# Altium PCB PCB4270Y_A00.PcbDoc (part 1 of 4)
Units mil, origin at the board's own origin, x right, y up, seen from the top; angles counter-clockwise.
Board outline 3622.05 x 2007.87 mil, 4 copper layers (Top Layer, Signal Layer 2, Signal Layer 3, Bottom Layer), stack 62.992 mil thick; 126 components, 105 nets, 457 pads, 1130 vias.
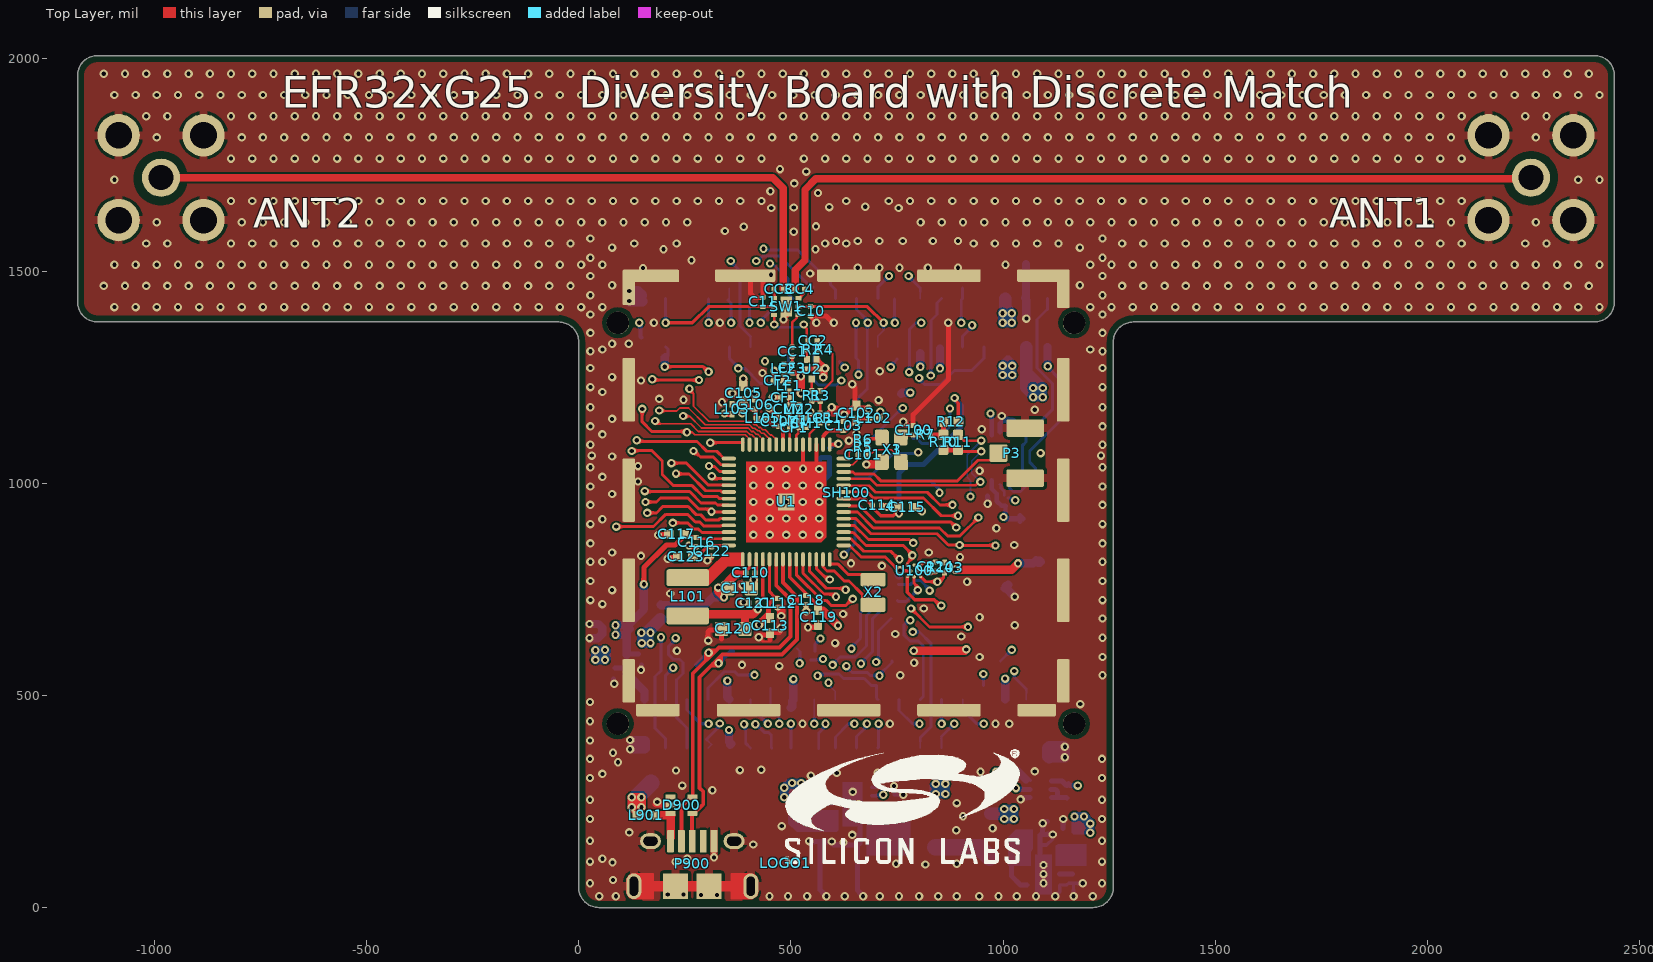
[diagram p0: Top Layer view]
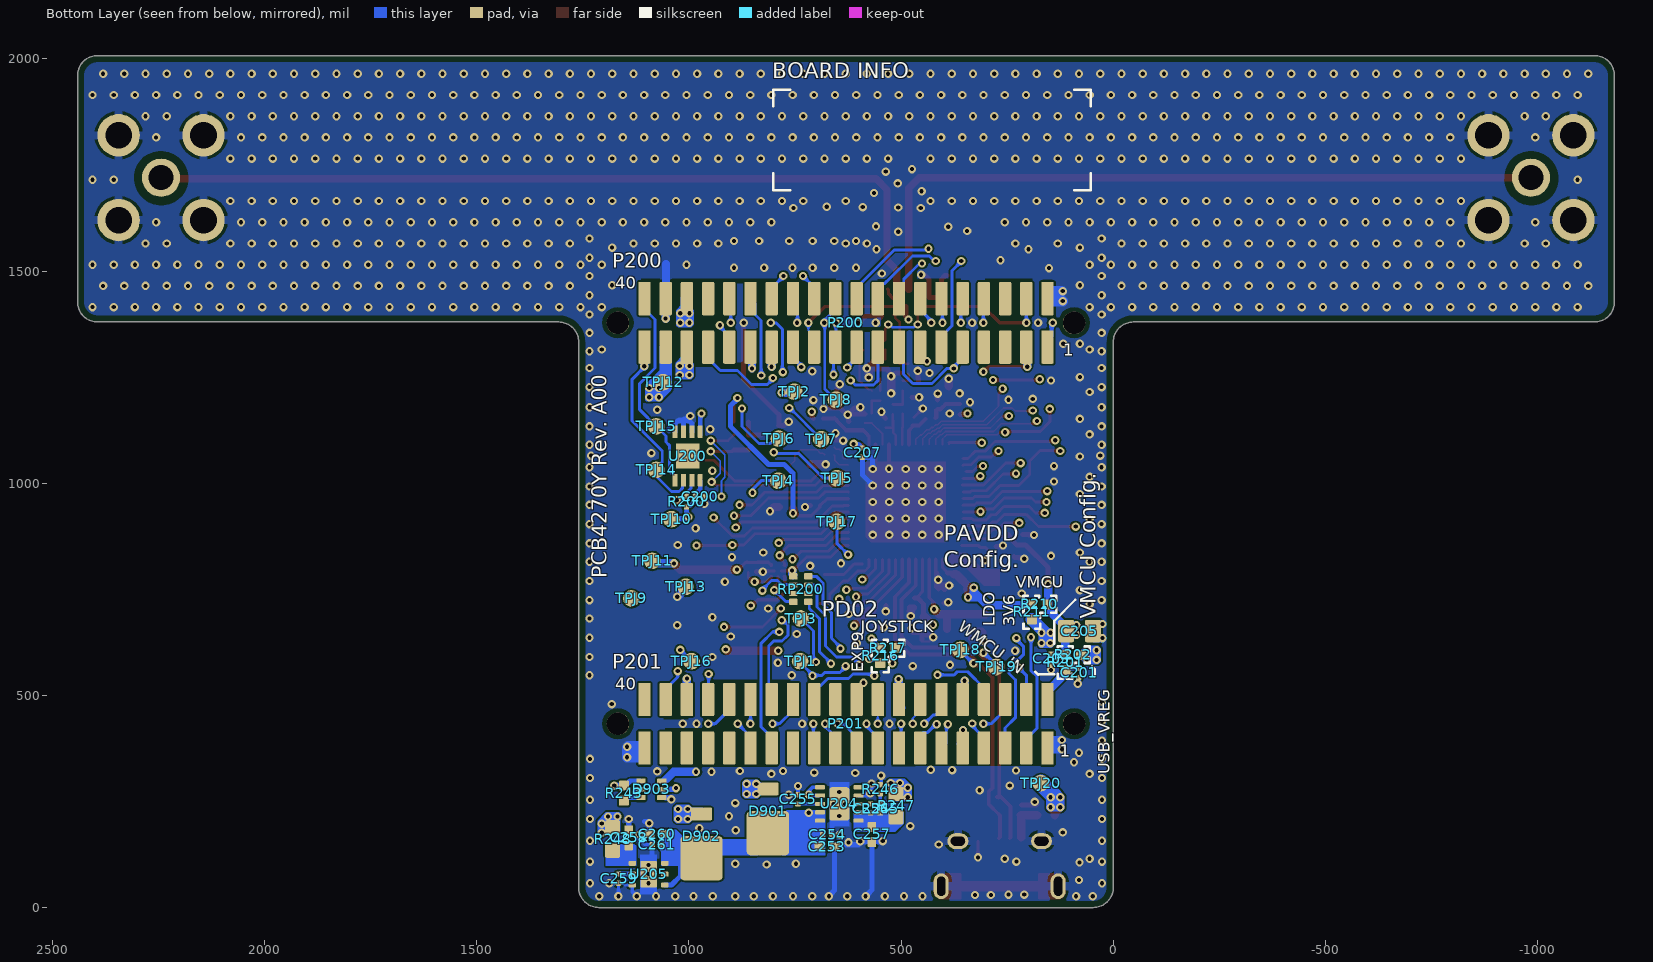
[diagram p1: Bottom Layer view, seen from below]
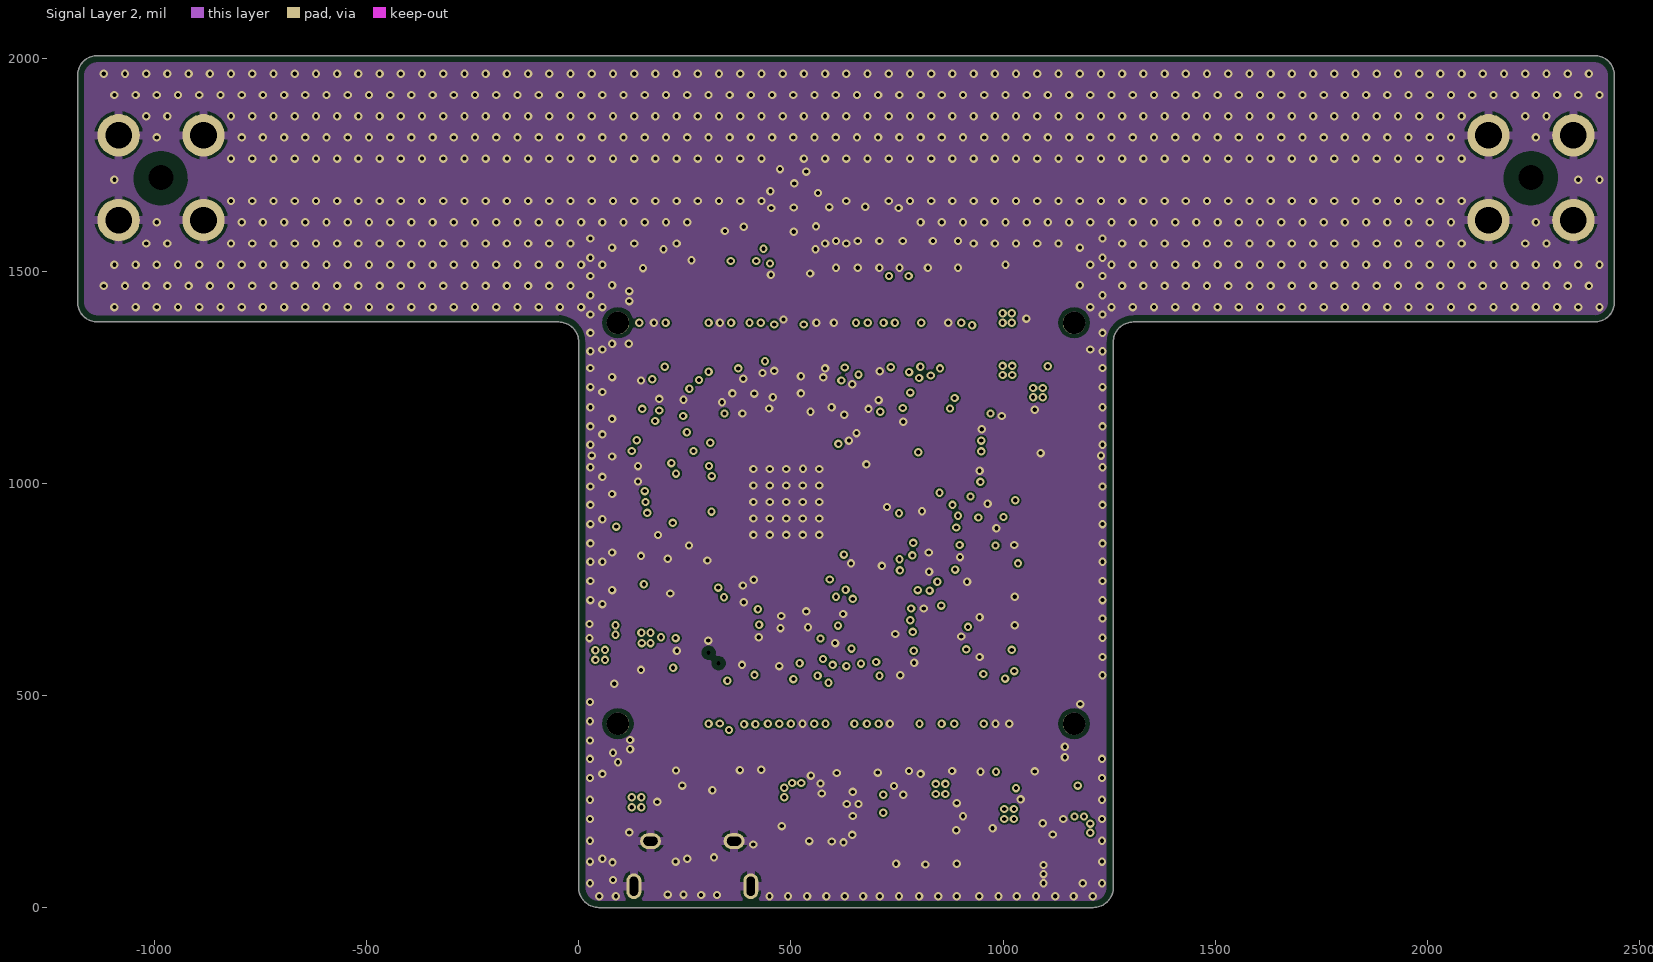
[diagram p2: Signal Layer 2]
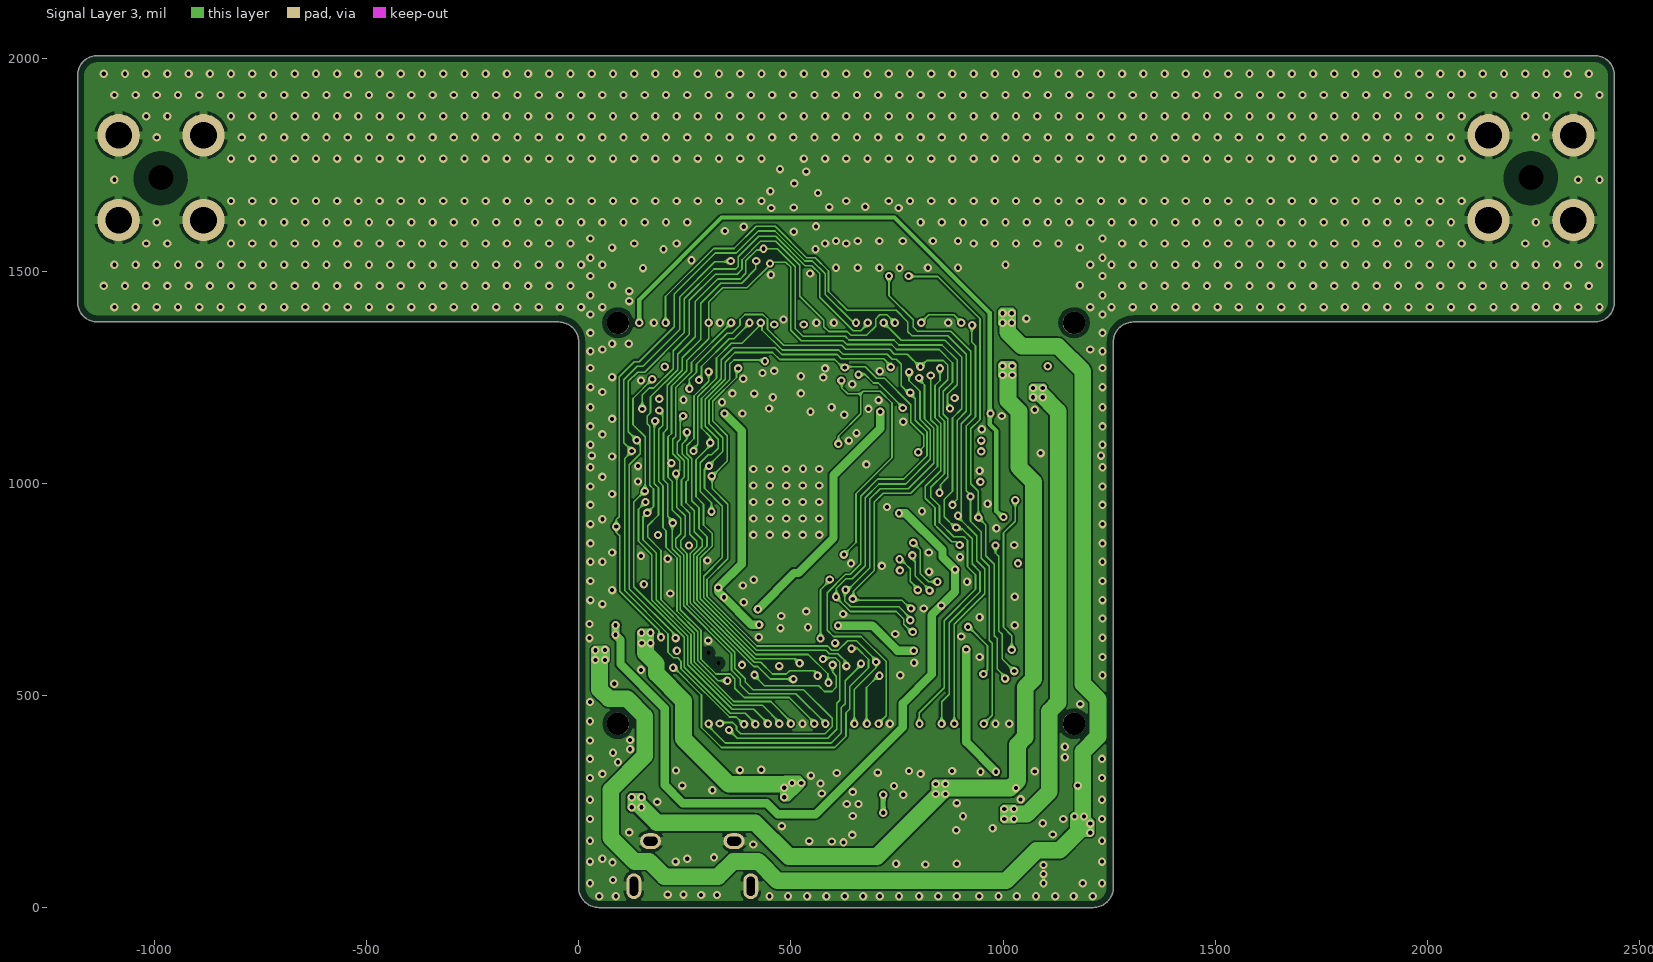
[diagram p3: Signal Layer 3]

## Layer stack, top to bottom
Top Solder: solder mask 0.4, Solder Resist, Dk 3.5
Top Layer: signal copper 1.378
Dielectric 1: core 12.7953, FR-4, Dk 4.2
Signal Layer 2: signal copper 0.7087
Dielectric 3: prepreg 33.2283, Dk 4.2
Signal Layer 3: signal copper 0.7087
Dielectric 2: core 12.7953, Dk 4.2
Bottom Layer: signal copper 1.378
Bottom Solder: solder mask 0.4, Solder Resist, Dk 3.5

## Board outline
0,1332.76 ccw(c-47.24,1332.76) -47.24,1380 -1133.86,1380 cw(c-1133.86,1427.24) -1181.1,1427.24 -1181.1,1960.63 cw(c-1133.86,1960.63) -1133.86,2007.87 2393.7,2007.87 cw(c2393.7,1960.63) 2440.94,1960.63 2440.94,1427.24 cw(c2393.7,1427.24) 2393.7,1380 1307.08,1380 ccw(c1307.08,1332.76) 1259.84,1332.76 1259.84,47.24 cw(c1212.6,47.24) 1212.6,0 47.24,0 cw(c47.24,47.24) 0,47.24

## Design rules (kind name [scope] priority, off if disabled: settings)
AcuteAngle [All] p1: minimum=7.00000000000000E+0001 checktracksonly=FALSE
BoardOutlineClearance [All] p1: gap=15.75 ignorepadtopadclearanceinfootprint=FALSE
Clearance Clearance_50Ohm [InNetClass('50Ohm') vs InNet('GND')] p1: gap=10 ignorepadtopadclearanceinfootprint=FALSE except(5.91: Track-SMDPad; 7.87: SMDPad-SMDPad)
Clearance Clearance_to_Holes [InPadClass('NPTH')] p2: gap=10 ignorepadtopadclearanceinfootprint=FALSE
Clearance Clearance_Outer_Layers_ThinGPIO [All vs OnLayer('Top Layer') and InNetClass('ThinGPIO')] p3: gap=3.94 ignorepadtopadclearanceinfootprint=FALSE
Clearance Clearance_Outer_Layers [All vs OnLayer('Top Layer') or OnLayer('Bottom Layer')] p4: gap=3.94 ignorepadtopadclearanceinfootprint=FALSE
Clearance Clearance_Inner_Layers [All vs OnLayer('Signal Layer 2') or OnLayer('Signal Layer 3')] p5: gap=3.94 ignorepadtopadclearanceinfootprint=FALSE except(6.89: Via-Via)
HoleToHoleClearance HoleToHoleClearance_ANT1toPAD [Incomponent ('ANT1') vs ISpad] p1: gap=0 allowstackedmicrovias=TRUE
HoleToHoleClearance HoleToHoleClearance_R1toR2_1 [Incomponent ('R1') vs Incomponent ('R2')] p2: gap=0 allowstackedmicrovias=TRUE
HoleToHoleClearance HoleToHoleClearance_U1toVIA_1 [InComponent ('U1') vs IsVia] p3: gap=0 allowstackedmicrovias=TRUE
HoleToHoleClearance [All] p4: gap=10 allowstackedmicrovias=TRUE
MinimumSolderMaskSliver [All] p1: minsoldermaskwidth=2.95
PolygonConnect Polygon_VIA_Connect [IsVia] p1: connectstyle=Direct reliefconductorwidth=10 reliefentries=4 polygonreliefangle="90 Angle" airgapwidth=10
PolygonConnect PolygonConnect_SH100 [InComponent('SH100')] p2: connectstyle=Direct reliefconductorwidth=10 reliefentries=4 polygonreliefangle="90 Angle" airgapwidth=5
PolygonConnect PolygonConnect_P1 [InComponent('P1') or InComponent('P900') or InComponent('P2') or InComponent('P3') or InComponent('ANT1') or InComponent('ANT2')] p3: connectstyle=Relief reliefconductorwidth=20 reliefentries=4 polygonreliefangle="90 Angle" airgapwidth=6.89
PolygonConnect [All] p4: connectstyle=NoConnect reliefconductorwidth=7.87 reliefentries=4 polygonreliefangle="90 Angle" airgapwidth=4.92
RoutingVias [All] p1: holewidth=11.81 width=25.59 viastyle="Through Hole" minholewidth=9.84 minwidth=19.68 maxholewidth=39.37 maxwidth=59.06
ShortCircuit ShortCircuit_ANTtoPAD [InNet('NetAT1_1') vs InNet('GND')] p1: allowed=TRUE
ShortCircuit ShortCircuit_R1toR2_1 [Incomponent ('R1') vs Incomponent ('R2')] p2: allowed=TRUE
ShortCircuit [All] p3: allowed=FALSE
SilkToSilkClearance [All] p1: silktosilkclearance=4
SilkToSolderMaskClearance [IsPad] p1: minsilkscreentomaskgap=4 clearancetoexposedcopper=TRUE
SolderMaskExpansion [All] p1: expansion=2 istentingtop=FALSE
Width 50ohm [InNet('50R*')] p1: maxlimit=18 minlimit=4.88 preferedwidth=18
Width [All] p2: maxlimit=200 minlimit=3.94 preferedwidth=4.92
25 further rules are at their usual default settings.

## Classes and differential pairs
net class EFR32_PD0[7..0]: DISP_SCS EFR32_PD00 EFR32_PD01 EFR32_PD02 EFR32_PD03 EFR32_PD04 EFR32_PD06 EFR32_PD07
net class EFR32_PC0[9..0]: DISP_SCLK DISP_SI EFR32_PC00 EFR32_PC01 EFR32_PC02 EFR32_PC03 EFR32_PC06 EFR32_PC07 EFR32_PC08 EFR32_PC09
net class EFR32_PB0[5..0]: DISP_ENABLE EFR32_PB00 EFR32_PB01 EFR32_PB02 EFR32_PB03 EFR32_PB04
component class "05_ WSTK Connectors & B": C200 P200 P201 R200 TPJ1 TPJ2 TPJ3 TPJ4 TPJ5 TPJ6 TPJ7 TPJ8 TPJ9 TPJ10 TPJ11 TPJ12 TPJ13 TPJ14 TPJ15 TPJ16 TPJ17 TPJ18 TPJ19 TPJ20 U200
component class "04_ EFR32 Signal Assign": C124 C207 P3 R10 R11 R12 R103 R216 R217 RP200 U1 U100 X2
component class "03_ Board Power": C201 C203 C205 C253 C254 C255 C256 C257 C258 C259 C260 C261 D900 D901 D902 D903 L901 P900 R201 R202 R243 R245 R246 R247 R248 U204 U205
component class "02_ RF & Power": ANT1 ANT2 C10 C11 C100 C101 C102 C103 C105 C106 C107 C110 C111 C112 C113 C114 C115 C116 C117 C118 C119 C120 C121 C122 C123 CC1 CC2 CC3 CC4 CF1 CF2 CF3 CM1 CM2 CP1 CR1 L101 L102 L103 L105 LF1 LF2 LM1 LM2 LR1 R1 R2 R3 R4 R5 R6 R7 R210 R211 SH100 SH101 SW1 U2 X1 X3
net class WSTK_P[45..0]: DBG_SWCLK DBG_SWDIOTMS "DBG_SWO / DBG_TDO" DBG_TDI DEBUG_TRACED1 DEBUG_TRACED2 DEBUG_TRACED3 DISP_ENABLE DISP_EXTCOMIN DISP_SCLK DISP_SCS DISP_SI EFR32_PA0 EFR32_PA8 EFR32_PA9 EFR32_PA10 EFR32_PA11 EFR32_PB00 EFR32_PB01 EFR32_PB02 EFR32_PB03 EFR32_PB04 EFR32_PC06 EFR32_PC07 EFR32_PC08 EFR32_PD03 EFR32_PD04 EXP_HEADER4 EXP_HEADER6 EXP_HEADER8 EXP_HEADER9 JOYSTICK WSTK_P19 WSTK_P22 WSTK_P28 WSTK_P30 WSTK_P32 WSTK_P34 WSTK_P38 WSTK_P39 WSTK_P40
net class WSTK_F[21..0]: DBG_RESET DBG_SWCLK DBG_SWDIOTMS "DBG_SWO / DBG_TDO" DBG_TDI DISP_ENABLE DISP_EXTCOMIN DISP_SCLK DISP_SCS DISP_SI EFR32_PA0 EFR32_PA8 EFR32_PA9 EFR32_PA10 EFR32_PA11 EFR32_PB00 EFR32_PB01 EFR32_PC06 EFR32_PC07 EFR32_PD03 EFR32_PD04 WSTK_F21
pad class NPTH: P200-M1 P200-M2 P201-M1 P201-M2
net class EFR32_PA[11..0]: DBG_SWCLK DBG_SWDIOTMS "DBG_SWO / DBG_TDO" DBG_TDI DEBUG_TRACED1 DEBUG_TRACED2 DEBUG_TRACED3 EFR32_PA0 EFR32_PA8 EFR32_PA9 EFR32_PA10 EFR32_PA11

## Components (designator, comment, footprint, x,y, rotation, side; value= is the part's Value field where it differs from the comment)
ANT1 "SMA" TE_SMA_1814832_TH_VER 2244.09,1720 r0 top (schematic designator P1)
ANT2 "SMA" TE_SMA_1814832_TH_VER -984.25,1720 r0 top (schematic designator P2)
C10 "10pF" C0201_L 546.26,1405.51 r270 top
C11 "10pF" C0201_L 434.06,1427.17 r90 top
C100 "100N" C0201_L 788.12,1124.8 r90 top
C101 "100P" C0201_L 669.29,1066.93 r180 top
C102 "1U" C0402_L 654.53,1165.35 r90 top
C103 "100P" C0201_L 623.03,1134.84 r90 top
C105 "470N" C0402_L 387.8,1211.61 r90 top
C106 "100P" C0201_L 414.37,1185.04 r90 top
C107 "100P" C0201_L 471.44,1144.69 r90 top
C110 "100N" C0201_L 404.53,788.39 r0 top
C111 "10U" C0603_L 378.94,751.97 r0 top
C112 "10N" C0201_L 468.5,717.52 r270 top
C113 "1U" C0402_L 450.79,664.37 r270 top
C114 "100N" C0201_L 702.76,947.83 r0 top
C115 "1U" C0402_L 772.64,943.9 r0 top
C116 "100N" C0201_L 276.57,861.22 r270 top
C117 "1U" C0402_L 230.31,879.92 r180 top
C118 "100N" C0201_L 535.43,724.41 r270 top
C119 "1U" C0402_L 563.98,684.06 r270 top
C120 "4U7" C0603_L 364.17,656.5 r180 top
C121 "100N" C0201_L 412.4,717.52 r180 top
C122 "100N" C0201_L 312.99,839.57 r270 top
C123 "1U" C0402_L 251.97,826.77 r180 top
C124 "100N" C0201_L 840.55,803.15 r270 top
C200 "100N" C0201_L 974.41,968.5 r180 bottom
C201 "100N" C0201_L 81.69,553.15 r270 bottom
C203 "100N" C0201_L 146.65,586.61 r270 bottom
C205 "10U" C0805_L 79.72,651.57 r180 bottom
C207 "100N" C0201_L 591.54,1071.85 r270 bottom
C253 "1U" C0402_L 675.2,143.7 r180 bottom
C254 "100N" C0201_L 674.21,171.26 r180 bottom
C255 "100N" C0201_L 743.11,254.92 r90 bottom
C256 "10N" C0201_L 571.85,233.27 r90 bottom
C257 "10U" C0402_L 568.9,172.24 r270 bottom
C258 "2U2" C0402_L 1141.73,164.37 r90 bottom
C259 "100N" C0201_L 1165.94,67.91 r270 bottom
C260 "1U" C0402_L 1075.79,173.23 r0 bottom
C261 "100N" C0201_L 1075.79,147.64 r0 bottom
CC1 "100pF" C0201_L 502.95,1310.04 r90 top
CC2 "100pF" C0201_L 551.18,1335.63 r180 top
CC3 "100pF" C0201_L 471.46,1456.69 r0 top
CC4 "100pF" C0201_L 521.06,1456.69 r180 top
CF1 "4.7pF" C0201_L 485.24,1201.77 r180 top
CF2 "10pF" C0201_L 469.49,1241.14 r180 top
CF3 "5.1pF" C0201_L 502.95,1270.67 r270 top
CM1 "11pF" C0201_L 536.42,1141.73 r90 top
CM2 "4.3pF" C0201_L 496.06,1174.21 r90 top
CP1 "1.5pF" C0201_L 507.87,1130.91 r0 top
CR1 "Unused" C0201_L 585.63,1152.56 r90 top
D900 "SP1001-04" SOT553_L 242.13,241.14 r0 top
D901 "SS3P3" DO-220AA 813.98,208.66 r90 bottom
D902 "SS3P3" DO-220AA 970.47,149.61 r90 bottom
D903 "FDY4000CZ" SOT-563 1088.58,278.54 r0 bottom
Designator39 "Comment" PCB_SPEC_4_LAYER -2665.35,4496.06 r0 top
L101 "2U2" COIL_1008_L 256.89,732.28 r270 top
L102 "BLM03AG700SN1D" COIL_MUR_BLM03_0201 695.87,1152.56 r180 top
L103 "0R" COIL_MUR_BLM03_0201 361.22,1174.21 r90 top
L105 "BLM03PG330SN1D" COIL_MUR_BLM03_0201 432.09,1152.56 r0 top
L901 "782422221" COIL_0402 158.46,217.52 r180 top
LF1 "6.8nH" COIL_0201_L 496.06,1229.33 r90 top
LF2 "6.8nH" COIL_0201_L 483.27,1269.69 r90 top
LM1 "22nH" COIL_0201_L 507.87,1147.64 r0 top
LM2 "6.2nH" COIL_0201_L 519.68,1174.21 r90 top
LOGO1 "Comment" LOGO_SILABS_W14.0 487.2,104.33 r0 top
LR1 "20nH" COIL_0201_L 568.9,1153.54 r90 top
P3 "U.FL" HIROSE_U.FL-R-SMT-1 1052.17,1070.87 r90 top
P200 "SOCKET_WCON_2X20_1.27MM_SMD" SAM_SFC-120-T2-D-A-2X20_SNUM 629.92,1377.95 r0 bottom locked
P201 "SOCKET_WCON_2X20_1.27MM_SMD" SAM_SFC-120-T2-D-A-2X20_SNUM 629.92,433.07 r0 bottom locked
P900 "USB MICRO-B" AMP_FCI_10118194 267.91,-6.89 r0 top
R1 "0R" R0201_L#1 549.21,1205.71 r90 top
R2 "0R" R0201_L#1 549.7,1313.98 r0 top
R3 "NM" R0201_L#1 568.9,1205.71 r270 top
R4 "NM" R0201_L#1 577.26,1313.98 r180 top
R5 "NM" R0201_L#1 669.29,1084.65 r180 top
R6 "0R" R0201_L#1 669.29,1102.36 r0 top
R7 "0R" R0201_L#1 816.93,1114.17 r180 top
R10 "0R" R0402_L 859.25,1096.46 r270 top
R11 "NM" R0402_L 893.7,1096.46 r270 top
R12 "NM" R0402_L 876.97,1144.69 r0 top
R103 "330K" R0201_L#1 862.2,801.18 r90 top
R200 "10K" R0201_L#1 1005.91,956.69 r270 bottom
R201 "0R" R0402_L 113.19,577.76 r270 bottom
R202 "0R" R0402_L 95.47,595.47 r180 bottom
R210 "0R" R0402_L 174.21,714.57 r0 bottom
R211 "0R" R0402_L 191.93,696.85 r90 bottom
R216 "0R" R0402_L 549.21,593.5 r90 bottom
R217 "0R" R0402_L 531.5,611.22 r180 bottom
R243 "33k" R0402_L 1153.54,269.69 r270 bottom
R245 "4.02k" R0201_L#2 549.21,233.27 r270 bottom
R246 "1.15k" R0201_L#2 549.21,278.54 r270 bottom
R247 "0R" R0603_L 511.81,240.16 r90 bottom
R248 "0R" R0603_L 1180.12,161.42 r90 bottom
RP200 "100R" RES_MNR04-8_PCB4270 736.22,750.47 r270 bottom
SH100 "RF_SHIELD_FRAME_BMI-S-203-F" RF_SHIELD_FRAME_BMI-S-203-F_PCB4270 629.92,977.36 r0 top locked
SW1 "SKY13438-374LF" SKY13438-374LF_FOOTPRINT 489.17,1416.34 r0 top
TPJ1 "TPJ_SMD" TP_1.0_SMD 738.19,580.71 r90 bottom locked
TPJ2 "TPJ_SMD" TP_1.0_SMD 751.97,1215.75 r90 bottom locked
TPJ3 "TPJ_SMD" TP_1.0_SMD 736.22,681.1 r90 bottom locked
TPJ4 "TPJ_SMD" TP_1.0_SMD 789.37,1005.91 r90 bottom locked
TPJ5 "TPJ_SMD" TP_1.0_SMD 651.58,1011.81 r90 bottom locked
TPJ6 "TPJ_SMD" TP_1.0_SMD 788.19,1105.12 r90 bottom locked
TPJ7 "TPJ_SMD" TP_1.0_SMD 688.58,1103.54 r90 bottom locked
TPJ8 "TPJ_SMD" TP_1.0_SMD 653.54,1196.85 r90 bottom locked
TPJ9 "TPJ_SMD" TP_1.0_SMD 1135.83,728.35 r90 bottom locked
TPJ10 "TPJ_SMD" TP_1.0_SMD 1041.34,915.35 r90 bottom locked
TPJ11 "TPJ_SMD" TP_1.0_SMD 1086.61,816.93 r90 bottom locked
TPJ12 "TPJ_SMD" TP_1.0_SMD 1061.02,1238.19 r90 bottom locked
TPJ13 "TPJ_SMD" TP_1.0_SMD 1007.87,755.91 r90 bottom locked
TPJ14 "TPJ_SMD" TP_1.0_SMD 1076.77,1031.5 r90 bottom locked
TPJ15 "TPJ_SMD" TP_1.0_SMD 1076.77,1133.86 r90 bottom locked
TPJ16 "TPJ_SMD" TP_1.0_SMD 994.09,580.71 r90 bottom locked
TPJ17 "TPJ_SMD" TP_1.0_SMD 651.58,909.45 r90 bottom locked
TPJ18 "TPJ_SMD" TP_1.0_SMD 360.24,607.09 r90 bottom locked
TPJ19 "TPJ_SMD" TP_1.0_SMD 275.59,566.93 r90 bottom locked
TPJ20 "TPJ_SMD" TP_1.0_SMD 170.87,293.31 r90 bottom locked
U1 "EFR32FG25B222F1920IM56" QFN56_M040_7.0X7.0_EP_SL 489.17,955.71 r180 top
U2 "SF4000-914-06-SX" SF1256 549.21,1268.7 r90 top value="SF4000-914-06-SX (US)"
U100 "MX25R8035F" BGA8_M040_1.24X1.75_WLCSP_PCB4270 790.35,793.31 r270 top
U200 "M24C02" TDFN8_M050_2.0X3.0_EP 1002.95,1063.98 r270 bottom
U204 "TPS7A92" WFDFN-10_EP_TPS7A92 645.67,244.09 r0 bottom
U205 "TPS79933DRVR" SON-6_EP_TPS79933DDCR 1095.08,78.74 r180 bottom
X1 "NM" KDS_DSX211SH_2016 737.2,1078.74 r270 top
X2 "32.768 kHz" X_MCS_CM8V-T1A 693.9,743.11 r270 top
X3 "39.0MHz" "TCXO TX0862AAAM53_SMD2016" 737.21,1078.74 r270 top value=38.4MHz

## Footprints (in the part's own frame and the unit in brackets; to place one, negate y for a bottom-side part, rotate by r counter-clockwise, add the part's x,y. Pads: shape width x height; smd on the part's side, far side on the other; paste and mask are expansions set on the pad)
AMP_FCI_10118194 [mm] "Amphenol FCI, 10118194-000XLF, Micro USB Type B (171108)"
  rrect20% 0.4x1.35 smd mask+0.076: 1(-1.305,4.15) 2(-0.655,4.15) 3(-0.005,4.15) 4(0.645,4.15) 5(1.295,4.15)
  oval 1.25x0.95 hole 0.55 slot 0.85 at 0 deg: 6(-2.505,4.15) 7(2.495,4.15)
  oval 0.9x1.55 hole 0.5 slot 1.15 at 90 deg paste-2539.97: 8(-3.505,1.45) 9(3.495,1.45)
  rrect5% 1.5x1.55 smd: 10(-1.005,1.45) 11(0.995,1.45)
  Top Layer region: -3.501,0.676 -2.33,0.676 -2.306,0.7 -2.308,2.206 -2.33,2.228 -3.497,2.228 -3.587,2.228 -3.754,2.159 -3.881,2.031 -3.95,1.865 -3.95,1.775 -3.95,1.775 -3.95,1.125 -3.95,1.036 -3.882,0.871 -3.755,0.744 -3.59,0.676 -3.501,0.676
  Top Layer region: 3.476,0.676 2.32,0.676 2.296,0.7 2.298,2.206 2.32,2.228 3.472,2.228 3.567,2.228 3.743,2.155 3.877,2.021 3.95,1.845 3.95,1.75 3.95,1.75 3.95,1.15 3.95,1.056 3.878,0.882 3.744,0.748 3.57,0.676 3.476,0.676
  body extent -4.05,-1.18 4,4.4, height 3.12
BGA8_M040_1.24X1.75_WLCSP_PCB4270 [mm] "BGA, 8 pin. U100"
  round 0.17 smd paste+0.02 mask+0.058: A1(-0.35,0.4) A3(0.35,0.4) E1(-0.35,-0.4) E3(0.35,-0.4)
  round 0.21 smd mask+0.038: B2(0,0.2) C1(-0.35,0) C3(0.35,0) D2(0,-0.2)
  Top Layer region: -0.263,-0.341 -0.263,-0.459 -0.301,-0.493 -0.35,-0.505 -0.35,-0.505 -0.403,-0.491 -0.441,-0.452 -0.455,-0.4 -0.455,-0.4 -0.447,-0.36 -0.424,-0.326 -0.39,-0.303 -0.35,-0.295 -0.35,-0.295 -0.301,-0.307 -0.263,-0.341
  Top Layer region: -0.263,0.459 -0.263,0.341 -0.301,0.307 -0.35,0.295 -0.35,0.295 -0.403,0.309 -0.441,0.348 -0.455,0.4 -0.455,0.4 -0.447,0.44 -0.424,0.474 -0.39,0.497 -0.35,0.505 -0.35,0.505 -0.301,0.493 -0.263,0.459
  Top Layer region: 0.263,0.341 0.263,0.459 0.301,0.493 0.35,0.505 0.35,0.505 0.403,0.491 0.441,0.452 0.455,0.4 0.455,0.4 0.447,0.36 0.424,0.326 0.39,0.303 0.35,0.295 0.35,0.295 0.301,0.307 0.263,0.341
  Top Layer region: 0.263,-0.459 0.263,-0.341 0.301,-0.307 0.35,-0.295 0.35,-0.295 0.403,-0.309 0.441,-0.348 0.455,-0.4 0.455,-0.4 0.447,-0.44 0.424,-0.474 0.39,-0.497 0.35,-0.505 0.35,-0.505 0.301,-0.493 0.263,-0.459
  body extent -0.63,-0.89 0.63,0.88, height 0.52
C0201_L [mm] "Capacitor, Chip; 0.60 mm L X 0.30 mm W X 0.33 mm H body"
  rrect52% 0.31x0.34 smd: 1(-0.275,0) 2(0.275,0)
  body extent -0.3,-0.15 0.3,0.15, height 0.3
C0402_L [mm] "Chip Capacitor, 2-Leads, Body 1.0x0.5mm, IPC High Density"
  rrect20% 0.6x0.5 smd mask+0.051: 1(-0.45,0) 2(0.45,0)
  body extent -0.5,-0.25 0.5,0.25, height 0.6
C0603_L [mm] "Capacitor, 0603, High Density (C)"
  rrect25% 0.8x0.85 smd: 1(-0.7,0) 2(0.7,0)
  body extent -0.8,-0.4 0.8,0.4, height 0.95
C0805_L [mm] "Capacitor, 0805"
  rrect25% 0.95x1.35 smd: 1(-0.8,0) 2(0.8,0)
  body extent -1.1,-0.72 1.1,0.72, height 1.45
COIL_0201_L [mm] "JELF243C-0021"
  rrect10% 0.3x0.3 smd: 1(-0.3,0) 2(0.3,0)
  body extent -0.32,-0.17 0.32,0.17, height 0.33
COIL_0402 [mm] "COIL_0402_L (3D from Wurth) (190308)"
  rrect20% 0.55x0.5 smd mask+0.051: 1(-0.525,0) 2(0.525,0)
  body extent -0.5,-0.25 0.5,0.25, height 0.5
COIL_1008_L [mil] "Chip Inductors, 1008 (2520), Coilcraft (190207)"
  rrect25% 40x100 smd: 1(-45,0) 2(45,0)
  body extent -58,-55 57,55, height 80
COIL_MUR_BLM03_0201 [mm] "COIL_MUR_BLM03_0201"
  rrect25% 0.4x0.3 smd mask+0.051: 1(-0.3,0) 2(0.3,0)
  body extent -0.3,-0.15 0.3,0.15, height 0.95
DO-220AA [mm] "Diode DO220AA (DO-220AA) (= SMP) (Vishay)"
  rrect20% 2.67x2.54 smd: 1(-0.85,0)
  rrect20% 0.762x1.27 smd: 2(1.8,0)
  body extent -2,-1.09 2.1,1.09, height 1.15
HIROSE_U.FL-R-SMT-1 [mm] "COAX_HIROSE_U.FL_CL331-0471"
  rrect20% 1.05x1.1 smd mask+0.051: 1(0,1.6)
  rrect20% 1.05x2.25 smd mask+0.051: 2(-1.5,0) 3(1.5,0)
  Top Layer pour cut-out: -0.85,0.9 0.85,0.9 0.85,0.9 0.85,-1.2 -0.85,-1.2 -0.85,-1.2
  body extent -1.3,-1.55 1.3,1.3, height 0.9
KDS_DSX211SH_2016 [mm] "Copy of Silabs CE  X_KDS_DSX211SH_2.0X1.65-4"
  rrect20% 0.875x0.8 smd mask+0.051: 1(-0.7,-0.55) 2(0.7,-0.55) 3(0.7,0.55) 4(-0.7,0.55)
  body extent -1.07,-0.87 1.08,0.88, height 0.5
LOGO_SILABS_W14.0 [mil] "LOGO_SILABS_W14.0"
  silkscreen extent 1,0 551,269
PCB_SPEC_4_LAYER [mil]
QFN56_M040_7.0X7.0_EP_SL [mm]
  rect 1x1 smd: 0(0,0)
  oval 0.86x0.22 smd: 1(-3.435,2.6) 2(-3.435,2.2) 3(-3.435,1.8) 4(-3.435,1.4) 5(-3.435,1) 6(-3.435,0.6) 7(-3.435,0.2) 8(-3.435,-0.2) 9(-3.435,-0.6) 10(-3.435,-1) 11(-3.435,-1.4) 12(-3.435,-1.8) 13(-3.435,-2.2) 14(-3.435,-2.6) 29(3.435,-2.6) 30(3.435,-2.2) 31(3.435,-1.8) 32(3.435,-1.4) 33(3.435,-1) 34(3.435,-0.6) 35(3.435,-0.2) 36(3.435,0.2) 37(3.435,0.6) 38(3.435,1) 39(3.435,1.4) 40(3.435,1.8) 41(3.435,2.2) 42(3.435,2.6)
  oval 0.22x0.86 smd: 15(-2.6,-3.435) 16(-2.2,-3.435) 17(-1.8,-3.435) 18(-1.4,-3.435) 19(-1,-3.435) 20(-0.6,-3.435) 21(-0.2,-3.435) 22(0.2,-3.435) 23(0.6,-3.435) 24(1,-3.435) 25(1.4,-3.435) 26(1.8,-3.435) 27(2.2,-3.435) 28(2.6,-3.435) 43(2.6,3.435) 44(2.2,3.435) 45(1.8,3.435) 46(1.4,3.435) 47(1,3.435) 48(0.6,3.435) 49(0.2,3.435) 50(-0.2,3.435) 51(-0.6,3.435) 52(-1,3.435) 53(-1.4,3.435) 54(-1.8,3.435) 55(-2.2,3.435) 56(-2.6,3.435)
  Top Layer pour cut-out: -3,-2.675 -2.675,-3 2.725,-3 3,-2.725 3,2.75 2.75,3 -2.725,3 -3,2.725
  Top Layer region: 2.4,-2.4 -2.4,-2.4 -2.4,2.1 -2.1,2.4 2.4,2.4
  body extent -3.5,-3.5 3.5,3.5, height 0.86
R0201_L#1 [mm] "Resistor (Chip2PinSM127P600-8N) (170921)"
  rrect25% 0.34x0.32 smd: 1(-0.3,0) 2(0.3,0)
  body extent -0.32,-0.13 0.32,0.13, height 0.3
R0201_L#2 [mm] "Resistor, Chip; 0.60 mm L X 0.30 mm W X 0.28 mm H body"
  rrect52% 0.31x0.34 smd: 1(-0.275,0) 2(0.275,0)
  body extent -0.3,-0.15 0.3,0.15, height 0.23
R0402_L [mm] "Chip Resistor, 2-Leads, Body 1.0x0.5mm, IPC High Density"
  rrect20% 0.6x0.6 smd mask+0.051: 1(-0.45,0) 2(0.45,0)
  body extent -0.5,-0.25 0.5,0.25, height 0.6
R0603_L [mm] "Chip Resistor, 0603, High density, Level C (_L) (170210)"
  rrect25% 0.85x0.9 smd: 1(-0.7,0) 2(0.7,0)
  body extent -0.8,-0.4 0.8,0.4, height 0.95
RES_MNR04-8_PCB4270 [mm] "Chip resistor network 8pin"
  rrect20% 0.375x0.5 smd mask+0.051: 1(-0.763,-0.45) 4(0.763,-0.45) 5(0.763,0.45) 8(-0.763,0.45)
  rrect20% 0.3x0.5 smd mask+0.051: 2(-0.25,-0.45) 3(0.25,-0.45) 6(0.25,0.45) 7(-0.25,0.45)
  body extent -1,-0.4 1,0.4, height 0.5
RF_SHIELD_FRAME_BMI-S-203-F_PCB4270 [mm] "RF_SHIELD_FRAME_BMI-S-203-F"
  rrect20% 0.75x3.8 smd paste+0 mask+0.05: 1(-13.005,-5.835) 1(-13.005,0.165) 1(-13.005,6.165) 1(13.005,-5.835) 1(13.005,0.165) 1(13.005,6.165)
  rrect20% 0.75x2.6 smd paste+0 mask+0.05: 1(-13.005,-11.259) 1(13.005,-11.259)
  rrect20% 0.75x2.1 smd paste+0 mask+0.05: 1(-13.005,12.294)
  oval 0.75x0.254 smd paste+0 mask+0.05: 1(-13.004,12.994) 1(12.994,12.994) 1(12.994,12.994) 1(12.994,12.994)
  rrect20% 3.375x0.75 smd paste+0 mask+0.05: 1(-11.684,12.979)
  rrect20% 2.6x0.75 smd paste+0 mask+0.05: 1(-11.259,-13.005)
  rrect20% 3.6x0.75 smd paste+0 mask+0.05: 1(-6.035,13.005)
  rrect20% 3.8x0.75 smd paste+0 mask+0.05: 1(-5.835,-13.005) 1(0.165,-13.005) 1(0.165,13.005) 1(6.165,-13.005) 1(6.165,13.005)
  rrect20% 2.3x0.75 smd paste+0 mask+0.05: 1(11.411,-13.005)
  rrect20% 3.125x0.75 smd paste+0 mask+0.05: 1(11.811,13.005)
  rrect20% 0.75x2.3 smd paste+0 mask+0.05: 1(13.005,12.217)
  body extent -13.3,-13.3 13.3,13.3, height 5.5
SAM_SFC-120-T2-D-A-2X20_SNUM [mm]
  rrect20% 0.74x2 smd mask+0.05: 1(-12.065,1.45) 2(-12.065,-1.45) 3(-10.795,1.45) 4(-10.795,-1.45) 5(-9.525,1.45) 6(-9.525,-1.45) 7(-8.255,1.45) 8(-8.255,-1.45) 9(-6.985,1.45) 10(-6.985,-1.45) 11(-5.715,1.45) 12(-5.715,-1.45) 13(-4.445,1.45) 14(-4.445,-1.45) 15(-3.175,1.45) 16(-3.175,-1.45) 17(-1.905,1.45) 18(-1.905,-1.45) 19(-0.635,1.45) 20(-0.635,-1.45) 21(0.635,1.45) 22(0.635,-1.45) 23(1.905,1.45) 24(1.905,-1.45) 25(3.175,1.45) 26(3.175,-1.45) 27(4.445,1.45) 28(4.445,-1.45) 29(5.715,1.45) 30(5.715,-1.45) 31(6.985,1.45) 32(6.985,-1.45) 33(8.255,1.45) 34(8.255,-1.45) 35(9.525,1.45) 36(9.525,-1.45) 37(10.795,1.45) 38(10.795,-1.45) 39(12.065,1.45) 40(12.065,-1.45)
  round 1.35 hole 1.35 unplated paste-2539.97 mask-5.563: M1(13.652,0) M2(-13.652,0)
  body extent -14.29,-2.1 14.29,2.16, height 4.67
SF1256 [mm] "nihon dempa kogyo  SF1256-923-02a"
  rect 0.425x0.375 smd: 1(-0.588,0) 3(0.588,-0.288) 4(0.588,0.288)
  rect 0.3x0.525 smd: 2(0,-0.365) 5(0,0.365)
  body extent -0.67,-0.53 0.67,0.53, height 0.54
SKY13438-374LF_FOOTPRINT [mm]
  rect 0.35x0.25 smd paste-1 mask+0: 1(-0.725,0.5) 2(-0.725,0) 3(-0.725,-0.5) 4(0.725,-0.5) 5(0.725,0) 6(0.725,0.5)
  rect 0.7x1.2 smd paste-2 mask+0: 7(0,0)
SON-6_EP_TPS79933DDCR [mm]
  rrect50% 0.45x0.3 smd mask+0.05: 1(-0.975,0.65) 2(-0.975,0) 3(-0.975,-0.65) 4(0.975,-0.65) 5(0.975,0) 6(0.975,0.65)
  rrect15% 1x1.6 smd paste-2 mask+0.05: 7(0,0)
  rrect25% 1x0.7 on Bottom Paste paste+0: ""(0,-0.45) ""(0,0.45)
  body extent -1.04,-1.04 1.04,1.04, height 0.76
SOT553_L [mm] "SOT553 (_M050_W1.2_), 5-Leads, Body 1.60x1.20mm, Pitch 0.5mm, HiDens (180615)"
  rrect25% 0.6x0.3 smd: 1(-0.65,0.5) 2(-0.65,0) 3(-0.65,-0.5) 4(0.65,-0.5) 5(0.65,0.5)
  body extent -0.65,-0.85 0.65,0.85, height 0.6
SOT-563 [mm] "diodes DT1446-04V"
  rrect20% 0.55x0.3 smd paste+0 mask+0.051: 1(-0.625,0.5) 2(-0.625,0) 3(-0.625,-0.5) 4(0.625,-0.5) 5(0.625,0) 6(0.625,0.5)
  body extent -0.6,-0.8 0.6,0.8, height 0.61
"TCXO TX0862AAAM53_SMD2016" [mm] "TCXO TX0862AAAM53_SMD2016"
  rrect20% 0.6x0.8 smd mask+0.051: 1(-0.9,-0.6) 2(0.9,-0.6) 3(0.9,0.6) 4(-0.9,0.6)
  body extent -1.07,-0.87 1.07,0.87, height 0.81
TDFN8_M050_2.0X3.0_EP [mm] "TDFN8_M050_2.0x3.0_EP"
  rrect20% 0.75x0.3 smd mask+0.051: 1(-1.45,0.75) 2(-1.45,0.25) 3(-1.45,-0.25) 4(-1.45,-0.75) 5(1.45,-0.75) 6(1.45,-0.25) 7(1.45,0.25) 8(1.45,0.75)
  rect 1.5x1.4 smd mask+0.051: 9(0,0)
  body extent -1.5,-1 1.5,1, height 1.01
TE_SMA_1814832_TH_VER [mm]
  round 2.286 / inner round 0 / far side round 2.286 hole 1.5: 1(0,0)
  round 2.54 hole 1.6: 2(-2.54,-2.54) 3(2.54,-2.54) 4(2.54,2.54) 5(-2.54,2.54)
  body extent -3.2,-3.2 3.2,3.2, height 9.5
TP_1.0_SMD [mm] "Test Point, 1.0 mm, SMD"
  round 1 smd paste-0.501: 1(0,0)
  body extent -0.2,-0.2 0.2,0.2, height 0.01
WFDFN-10_EP_TPS7A92 [mm]
  rrect50% 0.6x0.25 smd mask+0.05: 1(-1.15,1) 2(-1.15,0.5) 3(-1.15,0) 4(-1.15,-0.5) 5(-1.15,-1) 6(1.15,-1) 7(1.15,-0.5) 8(1.15,0) 9(1.15,0.5) 10(1.15,1)
  rrect25% 1.2x2 smd paste-2 mask+0.05: 11(0,0)
  rrect15% 1.13x0.89 on Bottom Paste paste+0: ""(0,-0.525) ""(0,0.525)
  body extent -1.25,-1.25 1.25,1.25, height 0.76
X_MCS_CM8V-T1A [mm] "Crystal MCS CM8V-T1A (2 pin)"
  rrect25% 0.8x1.5 smd mask+0.051: 1(-0.75,0)
  rrect25% 0.85x1.5 smd mask+0.051: 2(0.75,0)
  body extent -1,-0.6 1,0.6, height 0.95

## Part data
ANT1 ANT2: library part SMA_TH_WELLSHOW, Mfg=Wellshow, Mfg #=C02AN31P00101, Price_1K=1.46
C10 C11 CC1 CC2 CC3 CC4 CF3 CM2 CR1: library part C0201, Tolerance=±0.05P, Mfg=Murata, Technology=C0G
  C10 C11 CF3: Mfg #=GRM0335C1H2R8WA01D
  CR1: Not Mounted=NM
C100 C110 C114 C116 C118 C121 C122 C124 C200 C201 C203 C207 C254 C255 C259 C261: library part C0201, Rating=16V, Tolerance=20%, Technology=X7S
C101 C103 C106 C107: library part C0201, Rating=25V, Tolerance=5%, Technology=C0G
C102 C113 C115 C117 C119 C123 C253 C258 C260: library part C0402, Rating=6.3V, Tolerance=10%
  C102 C113 C115 C117 C119 C123 C253 C260: Technology=X7R
  C258: Technology=X7S
C105: library part C0402, Rating=10V, Tolerance=10%, Technology=X7R
C111: library part C0603, Rating=6.3V, Tolerance=20%, Technology=X7R
C112 C256: library part C0201, Rating=16V, Tolerance=10%, Technology=X7R
C120: library part C0603, Rating=6.3V, Tolerance=10%, Technology=X7R
C205: library part CAPACITOR, Not Mounted=NM, Technology=X7R
C257: library part C0402, Rating=6.3V, Tolerance=20%, Technology=X6S
CF1 CF2 CM1 CP1: library part C0201, Tolerance=±0.1P, Mfg=Murata, Technology=C0G
  CF1 CP1: Mfg #=GRM0335C1H3R8BA01D
  CF2: Mfg #=GRM0335C1H4R0BA01D
  CM1: Mfg #=GRM0335C1H9R4BA01D
L101: library part L1008, Tolerance=+/-20%, Mfg=Murata, Mfg #=DFE2HCAH2R2MJ0L
L102 L103 L105: library part BLM03AX, Price_1K=0.05
  L102: Mfg=Murata, Mfg #=BLM03AG700SN1D
  L105: Mfg=Murata, Mfg #=BLM03PG330SN1D
L901: library part WE-CBA, Mfg="Würth Elektronik", Mfg #=782422221, Price_1K=0.02
LF1 LF2 LR1: library part L0201, Tolerance=±3%, Mfg=Murata
  LF1: Mfg #=LQP03HQ6N2H02D
  LF2: Mfg #=LQP03HQ8N2H02D
  LR1: Mfg #=LQP03HQ16NH02D
LM1: library part L0201, Tolerance=±0.1N, Mfg=Murata, Mfg #=LQP03HQ1N6B02D
LM2: library part L0201
P3: library part KLS_U.FL, Mfg=KLS, Mfg #=L-KLS1-IPEX-20279-001E-01, Not Mounted=NM, Price_1K=0.70
P900: library part "KLS L-KLS1-238-0-0-0", Mfg=KLS, Mfg #=L-KLS1-238-0-0-0-R, Price_1K=0.20
R1 R2 R3 R4 R5 R6 R7 R103 R200 R245 R246: library part R0201, Price_1K=0.005
R10 R11 R12 R201 R202 R210 R211 R216 R217 R243: library part R0402, Price_1K=0.005
  R202 R210 R217: Not Mounted=NM
R247 R248: library part R0603, Price_1K=0.005
RP200: library part MNR04M0APJ101, Mfg=ROHM, Mfg #=MNR04M0APJ101, Price_1K=0.0122
SW1: library part "Switch DPDT", Mfg=Infineon, Mfg #=BGS12WN6E6327XTSA1, Part Reference=SW1, PCB Footprint=XFDFN-6
TPJ1 TPJ2 TPJ3 TPJ4 TPJ5 TPJ6 TPJ7 TPJ8 TPJ17: library part TPJ_SMD_Dup1
U1: library part EFR32xG25_QFN56_HFCLKOUT, Mfg="Silicon Labs", Mfg #=EFR32FG25B222F1920IM56-AR
U2: "B2645 from Qualcomm also fits", Mfg=ACTE, Mfg #=SF4000-914-06-SX, Part Reference=U5, PCB Footprint=SF1256
U100: library part MX25R8035, Mfg=Macronix, Mfg #=MX25R8035FBDIL0, Price_1K=0.25
X1: library part DSX211SH, Mfg=Tai-Saw, Mfg #=TZ3541C, Price_1K=0.512
X2: library part CM8V-T1A, Mfg="Micro Crystal AG", Mfg #=CM8V-T1A-32.768KHZ-7PF-20PPM-TA-QC, Price_1K=0.3
X3: library part "TCXO TX0862AAAM53", Mfg=TXC, Mfg #=7Z-38.400MBG-T, Part Reference=X1, PCB Footprint=TCXO_7Z-38.400MBG-T_SMD2016_TXC
D900: Mfg=Littlefuse, Mfg #=SP1001-04XTG, Price_1K=0.187
D901 D902: Mfg=Vishay, Mfg #=SS3P3-M3/84A, Price_1K=0.12
D903: Mfg="ON Semiconductor", Mfg #=FDY4000CZ
P200 P201: Mfg=WCON, Mfg #=2344-220MS3CUNR6, Price_1K=3.44
SH100: Mfg="Laird Technologies", Mfg #=BMI-S-203-F, Not Mounted=NM, Price_1K=1.148
U200: CONTEC Footprint=MSOP8_M065_W3.0, Mfg="ST Microelectronics", Mfg #=M24C02-FMC6TG, Price_1K=0.06
U204: Mfg="Texas Instruments", Mfg #=TPS7A9201DSKR, Price 1k=1.2
U205: Mfg="Texas Instruments", Mfg #=TPS79933DRVR, Price 1k=0.38

## Via types
v1: diameter 19.68, hole 9.84, Top Layer to Bottom Layer, tented both sides, 1104 vias
v2: diameter 20, hole 9.84, Top Layer to Bottom Layer, tented both sides, 24 vias
v3: diameter 19.68/0/0/19.68 (per signal layer), hole 9.84, Top Layer to Bottom Layer, tented both sides, 2 vias

## Nets (pads, with @x,y where several pads share a name; then routed paths per layer and width w, separated by ;. In a path a pad name is that pad's centre, name@x,y a point inside that pad or via, vN(x,y) a via of type N, cw(c..) or ccw(c..) an arc to the next point about the centre after c; other vN are vias at no path point)
3V3: C200.1 P200.1 R200.2 TPJ10.1 U200.1 U200.8 | length 1826.7
  Signal Layer 3 w10: v1(142.72,1377.95) 142.72,1432.09 336.61,1625.98 744.09,1625.98 968.5,1401.57 968.5,1138.78 984.25,1123.03 984.25,934.06 998.03,920.28 v1(1000.98,920.28) v1@1000.98,925.2
  Bottom Layer w10: v1(142.72,1377.95) 142.72,1379.92 141.24,1378.44 145.67,1374.02 145.67,1345.47 P200.1@147.64,1343.5 ; v1@969.49,1164.37 969.98,1163.88 970.96,1164.86 973.43,1162.4 U200.1@973.43,1113.19 ; U200.8@973.43,1006.89 973.43,986.41 981.57,978.26 981.57,978.07 984.25,975.39 985.24,975.39 ; C200.1@985.24,974.41 985.31,974.33 985.31,957.6 996.06,946.85 R200.2@1004.92,946.85 ; v1@1005.91,920.28 1005.91,945.28 R200.2@1006.89,946.26
  Bottom Layer w12: v1(1000.98,920.28) 1004.92,916.34 1047.24,916.34 1040.35,923.23 TPJ10.1@1040.35,909.45
  other v1: 970.47,1164.37
5V: D902.2 P200.37 TPJ12.1 | length 1248.7
  Signal Layer 3 w39.37: 1027.16,220.32 1055.95,220.32 1109.25,273.62 1109.25,462.6 1129.92,483.27 1129.92,1169.29 1085.63,1213.58
  Bottom Layer w29.53: D902.2@970.47,220.47 1014.76,220.47 ; P200.37@1054.92,1320.87 1054.92,1225.59 1072.83,1207.68 v1@1085.63,1207.68
  other v1: 1002.95,208.66 1025.59,208.66 1002.95,232.28 1025.59,232.28 1070.87,1202.76 1093.5,1202.76 1070.87,1224.41 1093.5,1224.41
BOARD_ID_SCL: P200.39 TPJ14.1 U200.6 | length 437.5
  Bottom Layer w6.89: U200.6@1014.76,994.12 1014.76,989.17 1023.62,980.32 1041.34,980.32 1076.77,1015.75 TPJ14.1@1076.77,1031.5 1076.77,1035.43 1062.99,1049.21 1062.99,1075.79 1133.86,1146.65 1133.86,1245.08 1105.31,1273.62 v1(1105.31,1275.59)
  Bottom Layer w19.68: P200.39@1104.92,1320.87 1104.92,1275.98 v1(1105.31,1275.59)
BOARD_ID_SDA: P200.40 TPJ15.1 U200.5 | length 489.9
  Bottom Layer w4: U200.5@1032.48,1006.89 U200.5@1032.48,1015.75 ; TPJ15.1@1074.8,1130.91 TPJ15.1@1075.79,1130.91
  Bottom Layer w6.89: U200.5@1032.48,1015.75 1046.26,1029.53 1046.26,1089.57 1054.13,1097.44 1054.13,1111.22 TPJ15.1@1076.77,1133.86 1116.14,1173.23 1116.14,1235.24 1080.02,1271.36 1080.02,1386.12 P200.40@1103.35,1409.45 ; P200.40@1103.84,1408.96 P200.40@1104.92,1410.04 ; P200.40@1104.92,1435.04 P200.40@1104.92,1410.04 ; P200.40@1105.31,1410.43 P200.40@1104.92,1410.04
BOARD_ID_WP: R200.1 TPJ16.1 U200.7 | length 462.7
  Signal Layer 3 w3.94: v1(1020.67,607.28) 1020.67,640.75 1000.98,660.43 1000.98,882.87 1028.6,910.49 v1(1028.6,959.69)
  Bottom Layer w3.94: v1@1025.59,954.72 1028.6,957.73 v1(1028.6,959.69)
  Bottom Layer w6.89: U200.7@993.11,997.05 995.08,995.08 995.08,988.19 1002.95,980.31 R200.1@1002.95,972.44 ; TPJ16.1@994.09,580.71 v1(1020.67,607.28) ; R200.1@1011.81,965.55 1014.76,965.55 v1@1025.59,954.72
DBG_RESET: C207.1 P200.17 TPJ17.1 U1.15 | length 1004.4
  Top Layer w7.87: U1.15@591.54,1090.94 610.63,1090.94 v2(612.2,1092.52)
  Signal Layer 3 w3.94: v2(612.2,1092.52) 612.2,1111.22 664.37,1163.39 664.37,1210.63 ; v1@618.11,830.71 624.02,830.71 653.54,860.24 653.54,975.39 738.19,1060.04 738.19,1188.98 710.63,1216.54 670.28,1216.54 664.37,1210.63 ; v1@618.11,1243.11 620.08,1241.14 620.08,1224.41 633.86,1210.63 664.37,1210.63
  Bottom Layer w6.89: P200.17@554.92,1320.87 554.92,1241.39 565.01,1231.3 608.27,1231.3 v1(619.09,1242.13) ; v1(625.03,831.73) v1@625.03,833.63 ; v1@625,833.66 622.05,830.71 623.03,829.72 v1(625.03,831.73) 651.58,858.27 TPJ17.1@651.58,909.45
  Bottom Layer w11.81: C207.1@591.54,1082.68 600.39,1091.54 v2@611.22,1091.54
DBG_SWCLK: P200.14 P201.23 TPJ2.1 U1.30 | length 2120.7
  Top Layer w6.89: v1(270.69,1075.84) 272.65,1075.84 286.98,1061.52 317.15,1061.52 335.26,1043.41 352.85,1043.41 U1.30@353.94,1042.32
  Signal Layer 3 w3.94: v1@264.82,1076.7 270.67,1082.55 271.53,1082.55 280.51,1091.54 280.51,1203.43 324.8,1247.72 324.8,1295.16 359.36,1329.72 384.84,1329.72 v1@429.13,1374.02 ; v1@429.13,1373.69 432.09,1370.74 432.09,1361.22 479.33,1313.98 613.19,1313.98 623.03,1304.13 727.36,1304.13 739.17,1292.32 748.03,1292.32 759.84,1280.51 759.84,1229.33 v1@778.54,1210.63 ; v1@710.67,438.03 724.45,451.81 724.45,579.69 665.35,638.78 600.76,638.78 600.58,638.6 585.63,653.54 585.63,742.13 628.94,785.43 639.76,785.43 664.37,810.04 664.37,969.49 704.72,1009.84 765.75,1009.84 820.87,1064.96 820.87,1121.06 793.31,1148.62 793.31,1198.82 780.51,1211.61 781.5,1212.6 v1(781.5,1213.58) ; v1@429.13,1374.02 432.09,1376.97 431.1,1377.95 v1(429.13,1377.95) v1@429.13,1374.02
  Bottom Layer w3.94: v1(429.13,1377.95) v1@429.13,1382.92 ; P200.14@454.72,1435.04 P200.14@454.72,1436.02 ; P200.14@454.92,1408.71 P200.14@454.92,1435.04
  Bottom Layer w6.89: v1@429.13,1382.92 P200.14@454.92,1408.71 ; P201.23@704.92,375.98 706.69,377.76 v1@706.69,425.2
  Bottom Layer w11.81: TPJ2.1@757.87,1212.6 TPJ2.1@759.84,1210.63
  Bottom Layer w19.68: TPJ2.1@759.84,1210.63 762.8,1213.58 763.78,1212.6 764.76,1213.58 v1(781.5,1213.58)
  other v1: 706.69,433.07
DBG_SWDIOTMS: P200.13 P201.21 TPJ1.1 U1.31 | length 1521.3
  Top Layer w6.89: v1@306.54,1039.37 319.81,1039.37 329.56,1029.63 329.69,1029.63 331.65,1027.66 U1.31@347.44,1027.66
  Signal Layer 3 w3.94: v1@303.64,1038.88 339.57,1074.8 339.57,1107.28 307.09,1139.76 307.09,1195.25 356.3,1244.46 356.3,1280.73 365.93,1290.35 436.02,1290.35 v1(438.98,1287.4) ; v1(307.1,1040.41) 305.14,1040.41 296.26,1031.53 296.26,988.19 338.6,945.85 338.6,824.82 294.61,780.83 294.61,730.5 418.81,606.3 582.68,606.3 590.55,598.43 610.24,598.43 630.91,577.76 v1(630.91,568.9) ; v1@677.17,436.02 678.15,437.01 678.15,518.7 705.74,546.29 v1(708.7,546.29) ; v1@678.19,436.02 679.13,435.08 v1(679.13,433.07)
  Bottom Layer w6.89: v1(630.91,568.9) 628.94,568.9 644.19,553.64 680.12,553.64 686.52,547.24 707.68,547.24 738.19,577.76 TPJ1.1@738.19,580.71 ; P201.21@654.92,375.98 654.92,402.95 677.95,425.98 677.95,432.68 v1@677.54,433.09 ; v1@677.56,433.07 v1(679.13,433.07) ; v1@677.54,433.09 675.57,433.09 676.55,434.08 v1@677.54,433.09
"DBG_SWO / DBG_TDO": P200.9 P200.15 P201.19 TPJ3.1 U1.32 | length 1781.4
  Top Layer w6.89: v1@320.87,1010.83 U1.32@353.94,1010.83
  Signal Layer 3 w3.94: v1@312.99,1016.73 v1(313.48,1016.73) ; v1@314.45,1016.26 313.98,1016.73 v1(313.48,1016.73) ; v1(375.98,1270.67) 372.05,1266.73 372.05,1249.07 315.94,1192.97 315.94,1146.65 350.39,1112.2 350.39,1052.17 v1@314.45,1016.22 ; v1@647.64,430.12 649.61,432.09 v1(649.61,433.07) 649.61,513.78 700.79,564.96 700.79,580.71 700.82,582.64 654.53,628.94 633.86,628.94 611.22,606.3 596.46,606.3 586.61,616.14 420.1,616.14 302.48,733.76 302.48,772.95 351.38,821.85 351.38,950.79 314.45,987.71 v1@314.45,1016.22 ; v1@649.61,427.17 v1@649.61,430.12 ; v1@702.73,578.77 705.74,578.77 v1@706.69,579.72 ; v1(313.48,1016.73) 313.48,1016.28 313.99,1015.77 v1@314.45,1016.22
  Bottom Layer w6.89: P200.9@354.92,1320.87 354.92,1294.68 378.94,1270.67 391.73,1270.67 427.17,1235.24 472.44,1235.24 494.09,1256.89 494.09,1310.04 P200.15@504.92,1320.87 ; P201.19@604.92,375.98 604.92,402.17 635.83,433.07 v1@647.64,433.07 ; v1@706.69,585.63 706.69,651.57 TPJ3.1@736.22,681.1
  other v1: 700.82,578.77
DBG_TDI: P200.8 P200.16 P201.17 TPJ4.1 U1.33 | length 2856.4
  Top Layer w6.89: v1@219.49,1047.24 253.94,1047.24 305.12,996.06 U1.33@356.3,996.06
  Signal Layer 3 w3.94: v1(450.79,1517.91) v1@452.36,1516.34 ; v1(581.72,433.09) 581.72,434.02 511.57,504.18 401.33,504.18 380.91,524.61 380.91,538.39 359.94,559.35 359.94,598.36 247.29,711.01 247.29,830.78 228.35,849.72 228.35,869.09 240.16,880.91 240.16,917.32 220.47,937.01 220.47,1003.94 210.63,1013.78 210.63,1038.39 218.5,1046.26 v1(218.5,1047.24) 218.5,1049.21 210.63,1057.09 210.63,1109.25 218.5,1117.13 218.5,1228.35 254.92,1264.76 254.92,1289.37 306.1,1340.55 v1(306.1,1377.95) 306.1,1427.17 339.57,1460.63 396.65,1460.63 v1@452.36,1516.34 ; v1(850.39,977.59) 850.39,978.15 849.41,979.13 849.41,980.32 852.66,983.56 852.66,996.36 870.08,1013.78 870.08,1151.57 859.25,1162.4 859.25,1216.54 880.91,1238.19 880.91,1283.46 849.41,1314.96 749.02,1314.96 737.2,1326.77 631.89,1326.77 623.03,1335.63 524.61,1335.63 499.41,1360.83 499.41,1509.45 487.93,1520.93 456.95,1520.93 v1@452.36,1516.34
  Bottom Layer w3.94: P200.8@304.92,1435.04 P200.8@306.1,1433.86
  Bottom Layer w6.89: P200.8@306.1,1433.86 306.1,1381.89 v1@307.09,1380.91 ; v1(450.79,1517.91) 453.24,1515.47 458.76,1515.47 493.8,1480.42 493.8,1446.16 P200.16@504.92,1435.04 ; P201.17@565.75,375 565.75,411.22 v1@581.69,427.17 ; TPJ4.1@789.37,1005.91 829.72,1005.91 849.9,985.73 850.39,986.22 v1(850.39,977.59)
DEBUG_TRACED1: P200.10 P201.7 U1.34 | length 1846.6
  Top Layer w6.89: v1@231.3,1021.65 260.04,1021.65 299.41,982.28 333.39,982.28 336.35,979.33 U1.34@353.94,979.33
  Signal Layer 3 w3.94: v1(229.33,1022.64) 238.19,1031.5 238.19,1052.66 221.46,1069.39 221.46,1103.35 228.35,1110.24 228.35,1225.39 265.75,1262.8 265.75,1284.45 v1(359.25,1377.95) ; v1@235.24,1022.64 231.3,1018.7 231.3,942.91 250.98,923.23 250.98,875.98 240.16,865.16 240.16,849.04 255.16,834.04 255.16,714.27 367.81,601.62 367.81,564.28 392.72,539.37 392.72,531.5 410.8,513.41 529.9,513.41 597.47,445.83 597.47,426.57 580.35,409.45 381.89,409.45 372.05,419.29 372.05,427.17 363.17,436.04 334.49,436.04 v1(332.3,433.86)
  Bottom Layer w3.94: P201.7@300.81,396.28 313.01,384.07 P201.7@304.92,375.98 ; P200.10@351.38,1431.5 P200.10@354.92,1435.04 P200.10@354.92,1459.05
  Bottom Layer w6.89: P201.7@300.81,396.28 v1@337.6,433.07 ; P200.10@351.38,1431.5 359.25,1423.62 v1(359.25,1377.95)
DEBUG_TRACED2: P200.11 P201.11 U1.35 | length 1957.7
  Top Layer w6.89: v1@122.05,1076.77 172.24,1076.77 196.85,1052.17 196.85,1020.67 222.44,995.08 265.31,995.08 ; 266.26,995.04 292.79,968.5 326.77,968.5 331.69,963.58 U1.35@353.94,963.58
  Signal Layer 3 w3.94: v1@357.28,1522.64 358.27,1521.65 320.87,1521.65 238.19,1438.98 238.19,1362.2 151.57,1275.59 137.8,1275.59 106.3,1244.09 106.3,1095.47 120.08,1081.69 125,1081.69 125,1074.8 108.27,1058.07 108.27,747.05 210.63,644.69 210.63,601.38 223.43,588.58 233.27,588.58 241.14,580.71 241.14,562.99 355.31,448.82 371.06,448.82 v1@388.78,431.1
  Bottom Layer w3.94: P200.11@404.92,1320.87 P200.11@404.92,1346.06
  Bottom Layer w6.89: v1(358.27,1523.62) 358.27,1526.57 360.24,1524.61 358.27,1522.64 380.02,1500.89 380.02,1370.96 P200.11@404.92,1346.06 ; v1@393.7,428.15 393.7,387.21 P201.11@404.92,375.98
  other v1: 389.76,432.09 125.01,1075.84
DEBUG_TRACED3: P200.12 P201.13 U1.36 | length 1662.3
  Top Layer w6.89: v1(155.51,981.3) 156.5,980.32 261.5,980.32 288.51,953.3 322.49,953.3 326.87,948.92 352.85,948.92 U1.36@353.94,947.83 ; v1(173.23,1245.08) 175.2,1243.11 v1@281.5,1243.11
  Signal Layer 3 w3.94: v1(173.23,1245.08) 175.2,1245.08 176.18,1246.06 175.2,1247.05 127.95,1199.8 127.95,1137.8 156.5,1109.25 156.5,982.28 v1(155.51,981.3) 129.92,955.71 129.92,755.91 249.02,636.81 249.02,566.25 357.22,458.05 392.35,458.05 v1@420.28,430.12 ; v1@283.46,1242.13 289.37,1248.03 289.37,1275.04 354.88,1340.55 366.14,1340.55 v1@400.1,1374.51 ; v1(416.36,432.11) v1@418.29,432.11
  Bottom Layer w3.94: v1(402.56,1377.95) 404.53,1377.95 v1@402.56,1379.92
  Bottom Layer w6.89: v1@402.56,1379.92 402.56,1432.68 P200.12@404.92,1435.04 ; v1(416.36,432.11) 418.33,432.11 v1@419.29,433.07 ; v1@418.33,432.07 437.51,412.89 447.34,412.89 453.74,406.5 453.74,377.17 P201.13@454.92,375.98 ; v1@418.33,432.11 v1@419.29,433.07 ; v1@422.24,430.12 v1@419.29,433.07
  other v1: 283.46,1243.11
DISP_ENABLE: P200.27 P201.26 U1.23 | length 2185.4
  Top Layer w3.94: v1@254.92,1220.47 260.83,1220.47 270.67,1210.63 270.67,1181.1 306.1,1145.67 405.76,1145.67 413.68,1137.75 418.29,1137.75 424.83,1131.21 428.46,1131.21 434.03,1125.65 439.62,1125.65 451.49,1113.78 455.12,1113.78 458.66,1110.24 465.55,1103.35 U1.23@465.55,1090.94
  Signal Layer 3 w3.94: v1@254.92,1224.41 260.83,1230.31 260.83,1245.08 277.56,1261.81 277.56,1280.51 350.39,1353.35 361.22,1353.35 379.92,1372.05 379.92,1385.83 391.73,1397.64 434.06,1397.64 444.88,1386.81 444.88,1363.19 483.27,1324.8 620.08,1324.8 629.43,1315.45 732.78,1315.45 743.97,1304.26 774.48,1304.26 v1@804.13,1274.61 ; v1@803.19,433.11 802.17,432.09 802.17,458.66 861.22,517.72 861.22,676.18 935.04,750 935.04,784.45 916.34,803.15 916.34,865.16 907.48,874.02 883.86,874.02 850.39,907.48 850.39,946.85 829.72,967.52 829.72,990.16 862.2,1022.64 862.2,1145.67 849.41,1158.46 849.41,1223.43 870.08,1244.09 870.08,1278.54 859.25,1289.37 819.88,1289.37 v1(805.12,1274.61)
  Bottom Layer w3.94: P200.27@805.12,1306.1 P200.27@806.1,1307.09
  Bottom Layer w6.89: P201.26@754.92,490.16 754.92,464.57 786.4,433.09 v1(803.19,433.09)
  Bottom Layer w19.68: v1(805.12,1274.61) P200.27@805.12,1306.1
  other v1: 260.83,1222.44
DISP_EXTCOMIN: P200.31 P201.32 R11.1 | length 1335.3
  Top Layer w3.94: R11.1@893.7,1114.17 R11.1@893.92,1114.17
  Top Layer w6: R11.1@893.92,1114.17 907.69,1100.39 v2(948.82,1100.39)
  Signal Layer 3 w3.94: v1@926.18,1372.05 926.18,1332.68 935.04,1323.82 935.04,1156.5 913.39,1134.84 913.39,982.14 923.23,972.3 923.23,910.43 948.82,884.84 948.82,822.83 967.52,804.13 967.52,629.92 974.41,623.03 974.41,452.83 v1(954.72,433.14)
  Bottom Layer w3.94: P201.32@904.92,466.14 P201.32@904.92,490.16 ; v1(923.23,968.5) 923.23,1005.91 915.35,1013.78 915.35,1066.93 v2(948.82,1100.39)
  Bottom Layer w6.89: P201.32@904.92,466.14 937.92,433.14 v1(954.72,433.14) ; P200.31@904.92,1320.87 904.92,1346.85 v1@924.02,1365.95
  other v1: 927.17,1372.05
DISP_SCLK: P200.28 P201.36 U1.6 | length 1575.3
  Top Layer w6.89: U1.6@624.41,932.09 656.96,932.09 694.36,894.69 850.59,894.69 869.74,875.54 898.17,875.54 v1(941.93,919.29)
  Signal Layer 3 w3.94: v1(777.56,1488.19) 778.54,1487.2 846.46,1487.2 945.87,1387.8 945.87,1149.61 924.21,1127.95 924.21,999.02 941.93,981.3 v1(941.93,919.29) 959.65,901.57 959.65,828.74 979.33,809.06 979.33,640.75 986.22,633.86 986.22,562.09 1004.92,543.39 v1(1004.92,539.37)
  Bottom Layer w3.94: P200.28@804.92,1435.04 P200.28@804.92,1459.84
  Bottom Layer w6.89: v1@775.59,1489.17 P200.28@804.92,1459.84
  Bottom Layer w19.68: P201.36@1004.92,490.16 v1(1004.92,539.37)
DISP_SCS: P200.30 P201.34 U1.51 | length 1511.7
  Top Layer w6.89: U1.51@512.8,820.47 512.8,784.26 573.14,723.92 583.17,723.92 594.98,712.11 629.43,712.11 v1@648.62,731.3 ; v1(783.46,704.72) 826.77,661.42 v1(917.32,661.42)
  Signal Layer 3 w3.94: v1@647.64,727.36 647.64,745.08 696.85,794.29 696.85,955.71 717.52,976.38 782.48,976.38 845.47,1039.37 845.47,1133.86 829.72,1149.61 v1(829.72,1253.94) ; v1@648.62,724.44 761.78,724.44 782.48,703.74 v1@783.96,702.26 ; v1(917.32,661.42) 919.29,661.42 963.58,617.13 963.58,560.04 v1(953.74,550.2)
  Bottom Layer w6.89: v1@830.02,1255.22 830.02,1383.17 844.49,1397.64 844.49,1424.61 P200.30@854.92,1435.04 ; v1(953.74,550.2) P201.34@953.86,523.54
  other v1: 645.67,727.36